# Altium PCB DumbWatch.PcbDoc (part 2 of 2)
Units mil, origin at the board's own origin, x right, y up, seen from the top; angles counter-clockwise.
Board outline 1299.21 x 1299.21 mil, 4 copper layers (Top Layer, Layer 1, Layer 2, Bottom Layer), stack 41.778 mil thick; 57 components, 41 nets, 178 pads, 101 vias.
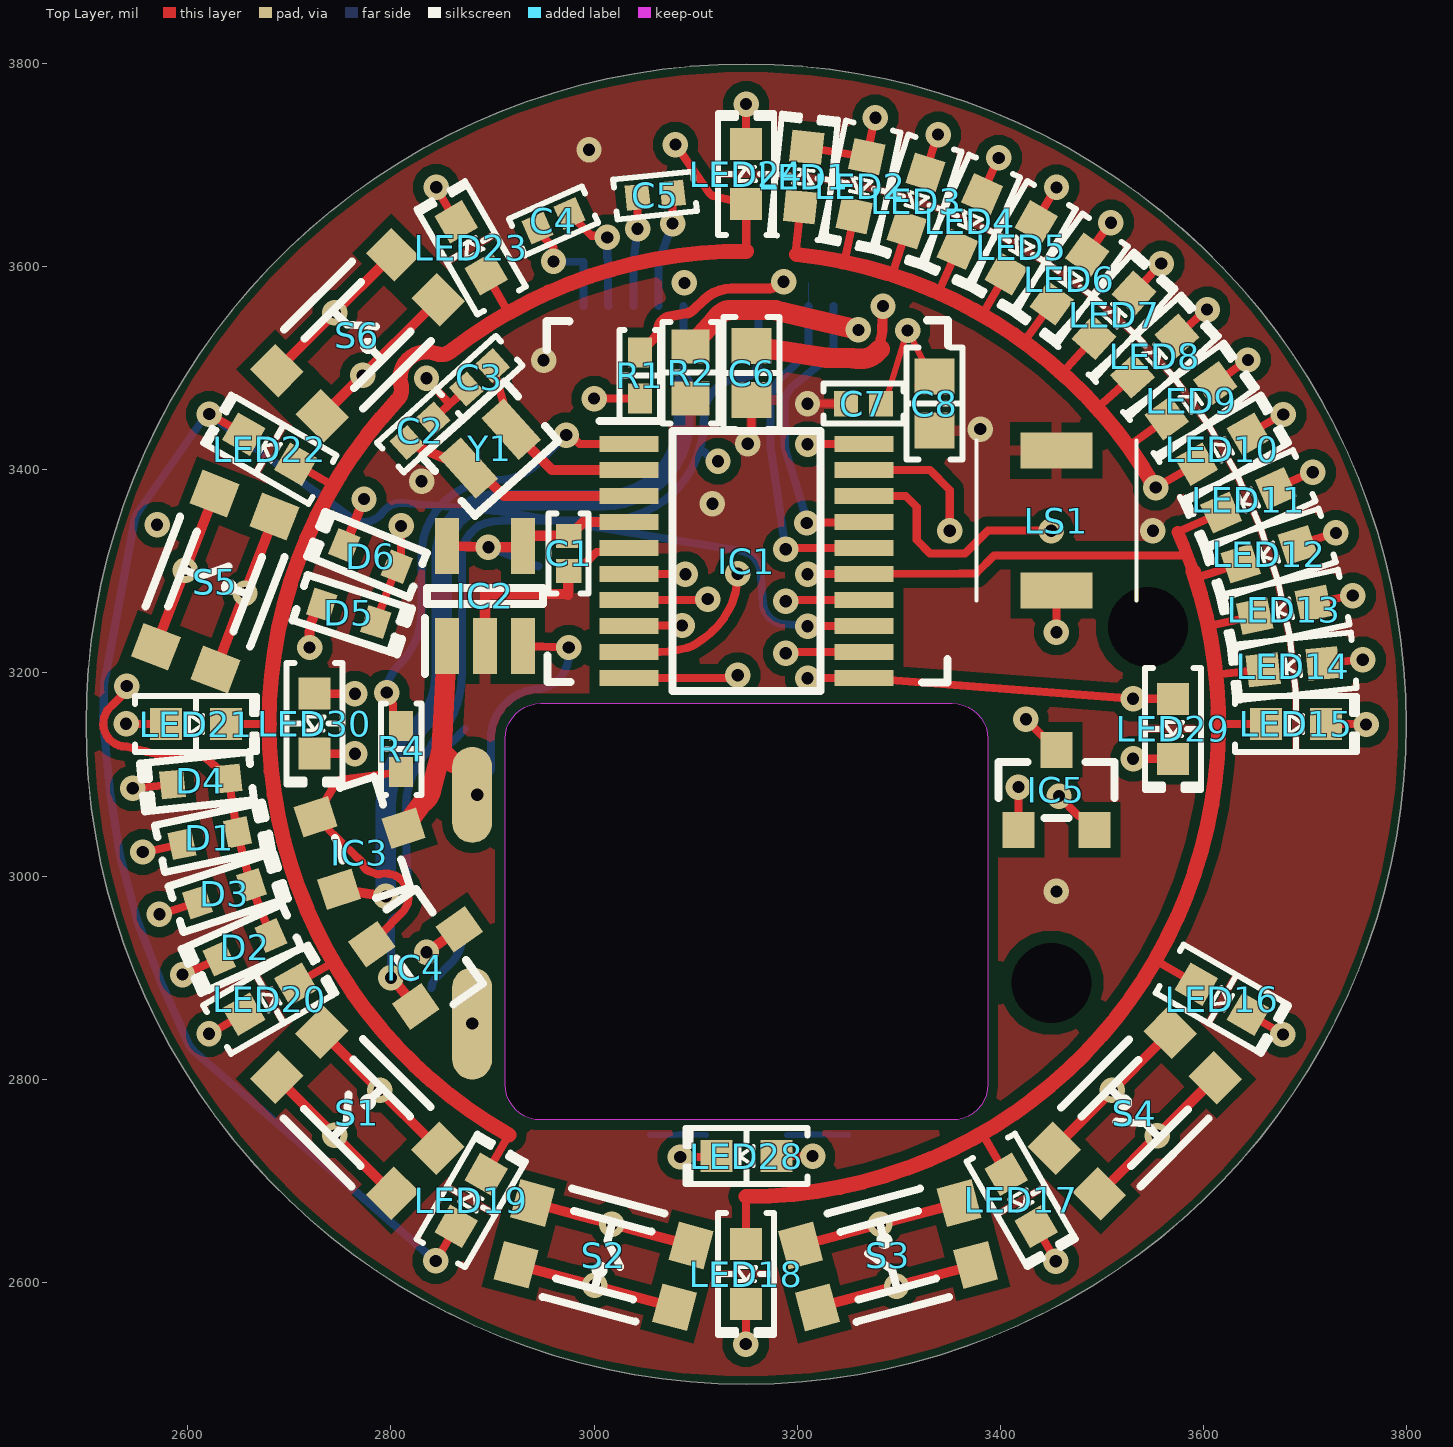
[diagram p0: Top Layer view]

## Silkscreen, mask and mechanical layers (free items; w line width, h text height) (continued)
Board Shape:
  circle w3.94: c3149.61,3149.61 r649.61
  lines w0.98: 3352.5,2760 ccw(c3352.5,2795) 3387.5,2795 ; 3352.58,2760 2947.5,2760 cw(c2947.5,2795) 2912.5,2795 2912.5,3135 cw(c2947.5,3135) 2947.5,3170 3352.5,3170 cw(c3352.5,3135) 3387.5,3135 3387.5,2794.92
Dimensions:
  circle w2: c3545,3245 r40
  circle w2: c3450,2895 r40
  circle w5: c3450,3340 r29.94
  circle w5: c3550,3340 r29.94
  circle w5: c3350,3340 r29.94
  circle w5: c3116.42,3366.42 r29.94
  circle w5: c3141.38,3197.65 r29.94
  circle w5: c3141.38,3297.65 r29.94
  circle w5: c2975,3225 r29.94
  circle w5: c2945,3305 r29.94
  circle w5: c3150,2625 r98.43
  circle w5: c3620,2985 r98.43
  circle w5: c3455,3485 r98.43
  circle w5: c2820,3520 r98.43
  circle w5: c2665,3040 r98.43
  lines w0.98: 2736.22,3149.61 3562.99,3149.61 ; 2912.5,3170 3387.5,2760 ; 3149.61,2736.22 3149.61,3562.99 ; 2953.29,3546.79 3348.29,3191.79 ; 2953.29,3546.79 2953.29,3191.79 3348.29,3191.79 ; 2953.29,3546.79 3348.29,3546.79 3348.29,3191.79
  lines w4: 3930,3050 3930,3250 4130,3250 4130,3050 3930,3050